# EAGLE board 2026-10-24_14-10-16 (EAGLE 6.4)
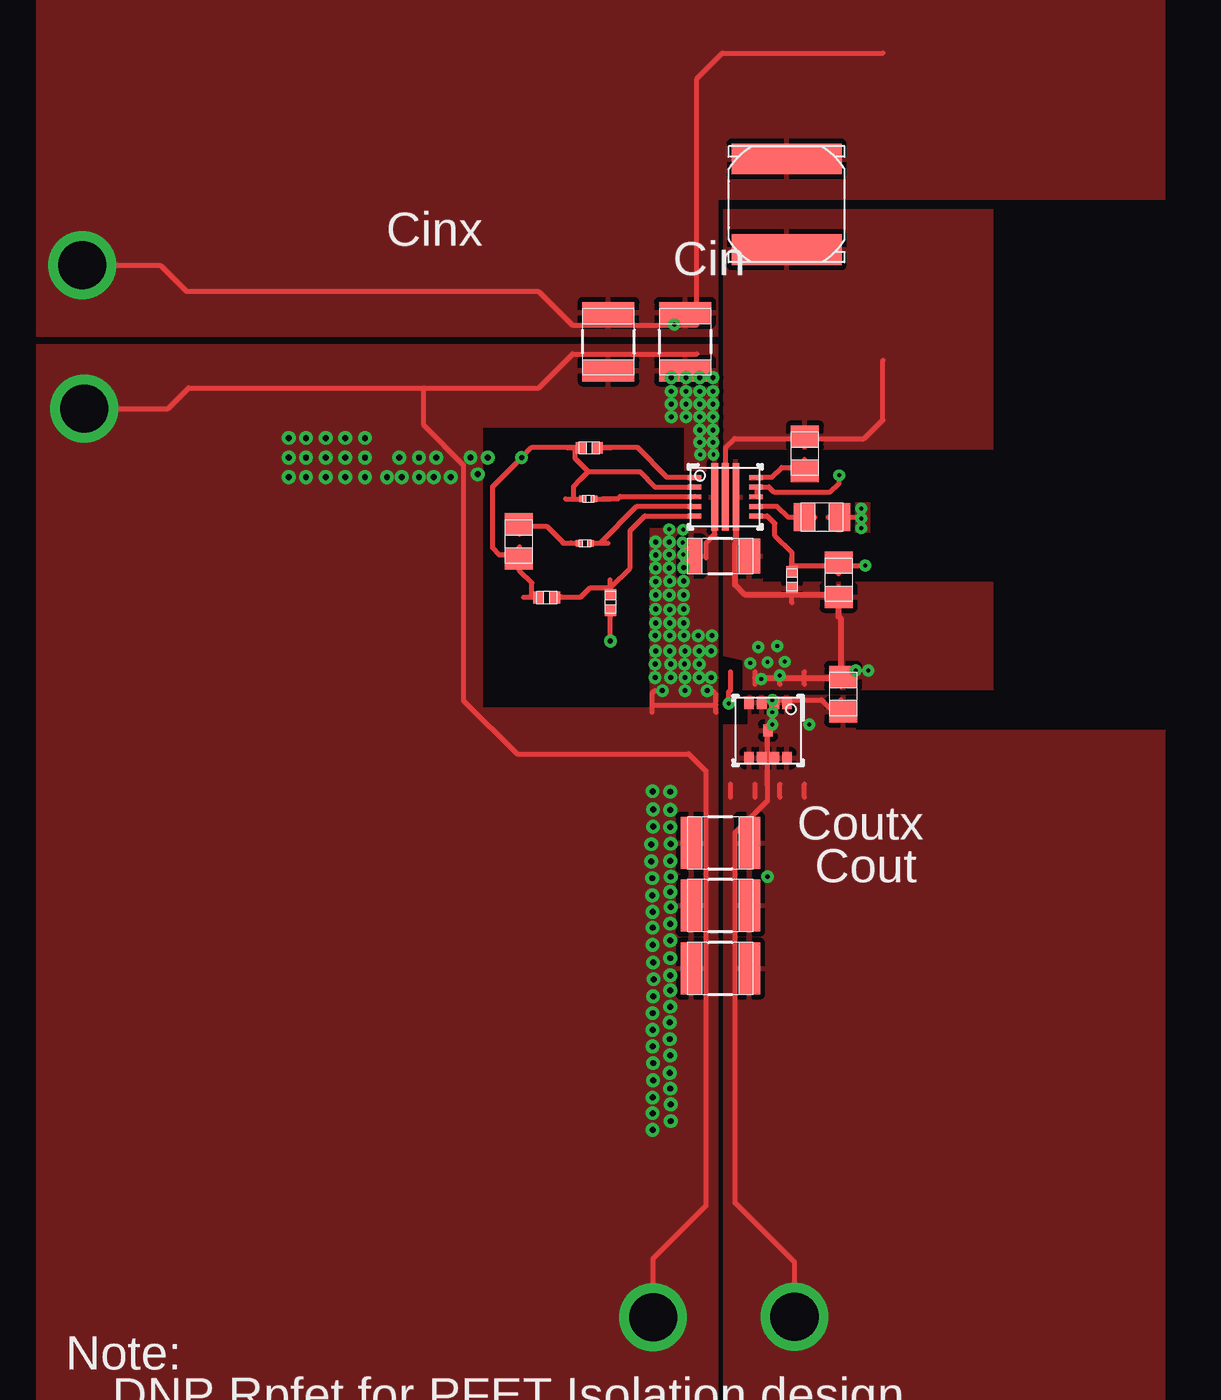
[diagram p0: board, top side]
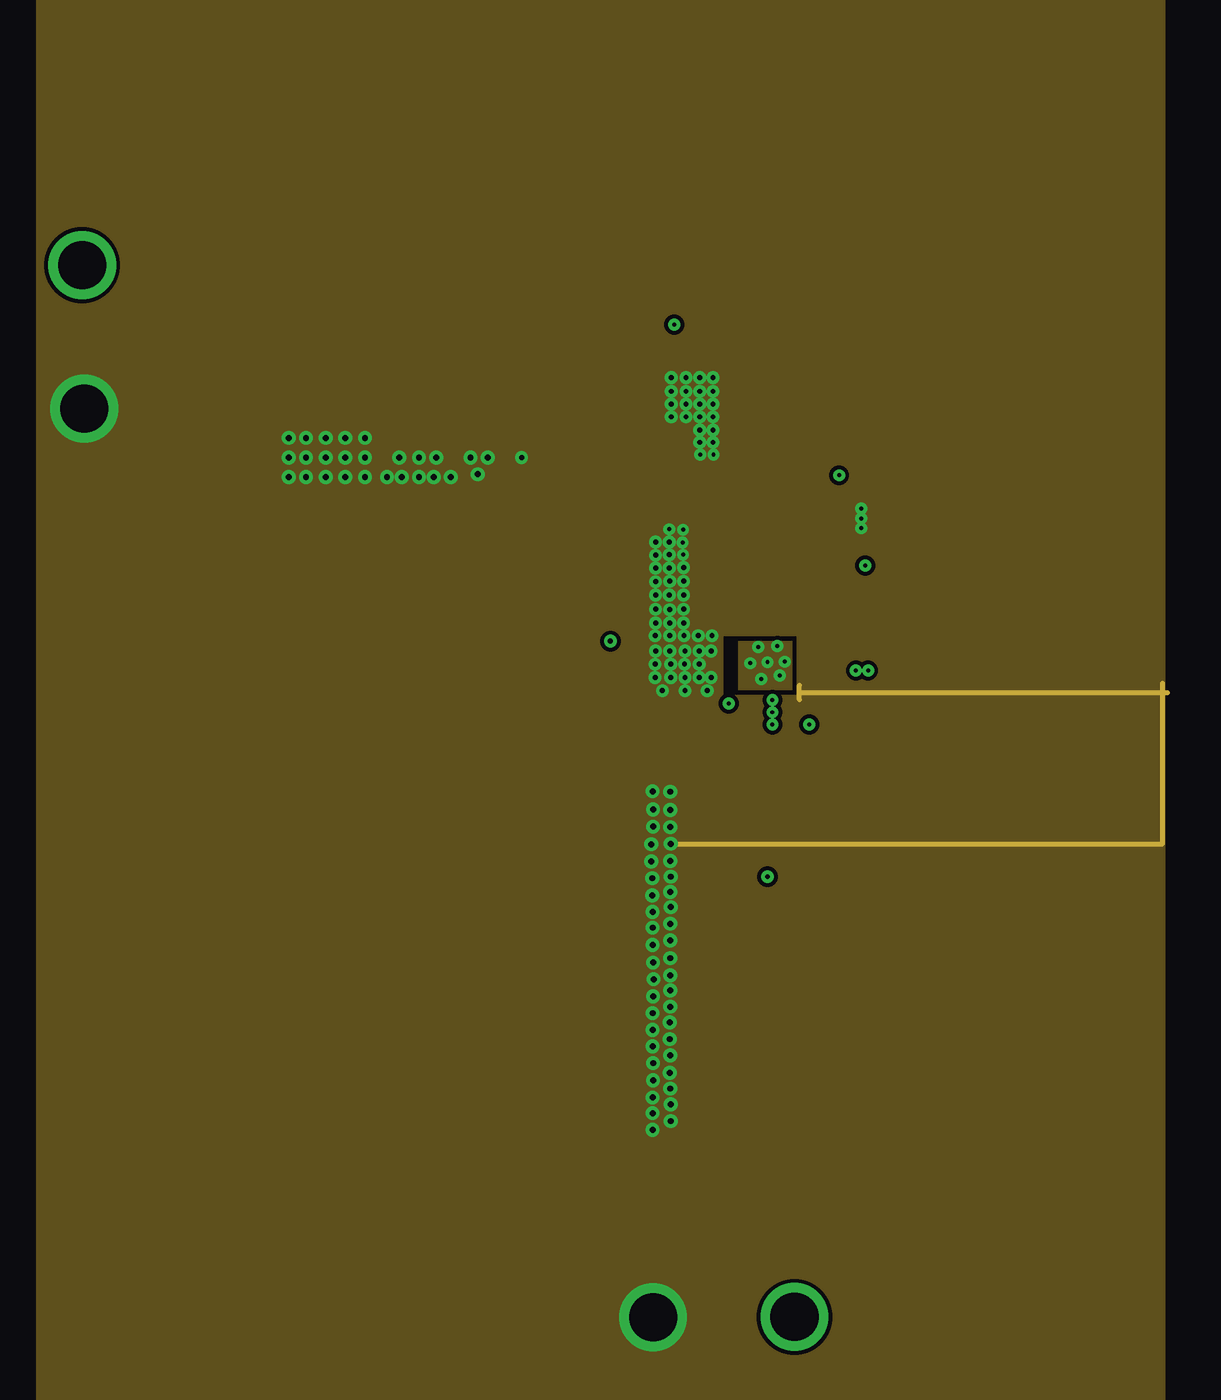
[diagram p1: board, inner layer INTERNAL1]
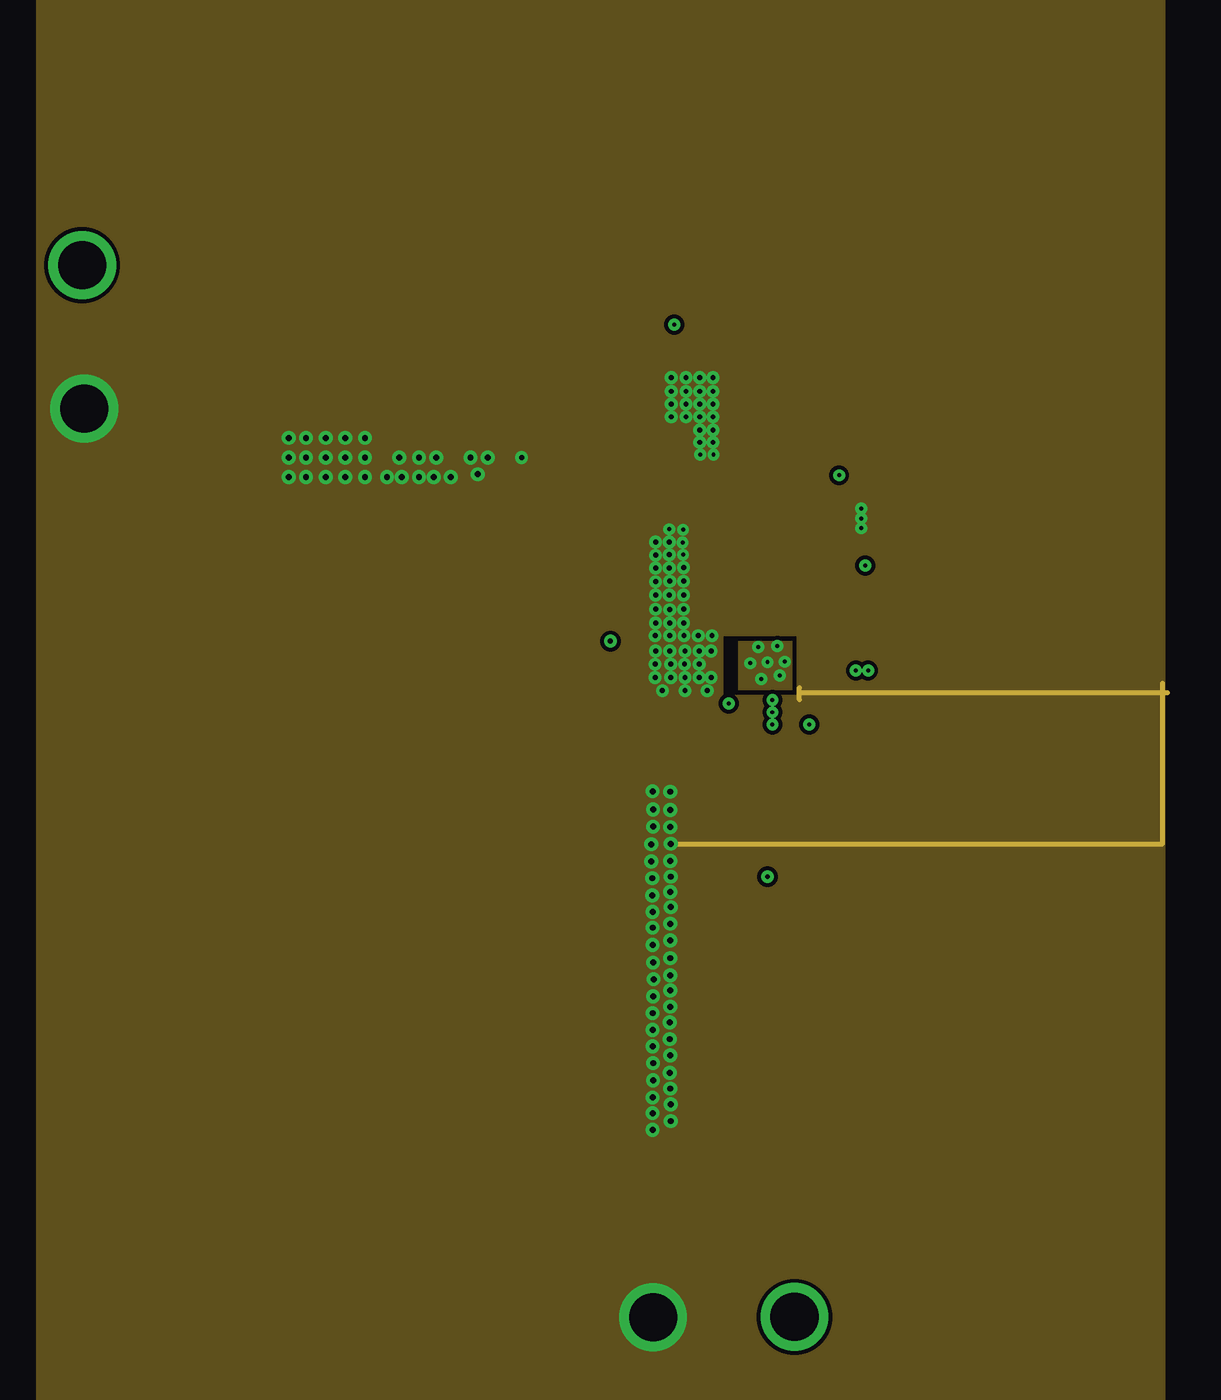
[diagram p2: board, inner layer INTERNAL2]
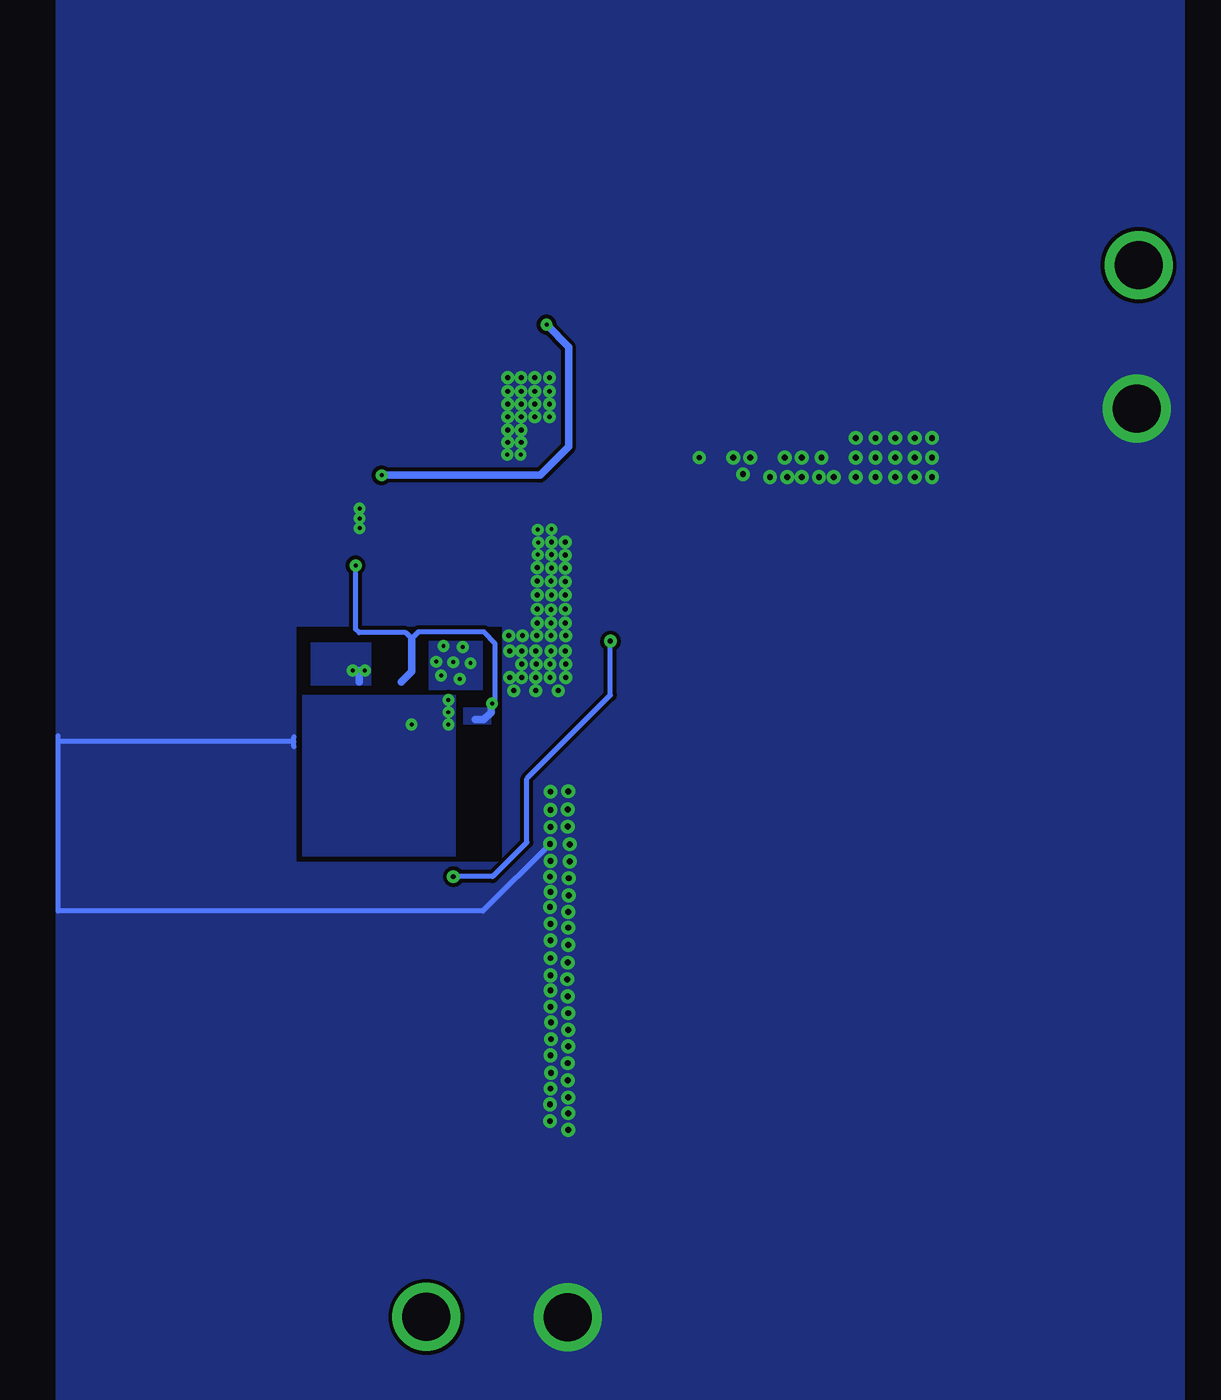
[diagram p3: board, bottom side, seen from below]

No outline drawn. Coordinates in mm, seen from the top.
Copper layers ((1*2)+(15*16)): TOP / INTERNAL1 / layer 15 / BOTTOM

## Footprints (pad centres in the part's own frame; a part is rotated, then mirrored left to right if it is on the bottom)
0805 = smd 1.118 x 1.448: 1 -0.902,0; 2 0.902,0
1210 = smd 1.118 x 2.692: 1 -1.499,0; 2 1.499,0
1206 = smd 1.118 x 1.803: 1 -1.499,0; 2 1.499,0
TP-1502 = drill 0.813 pad 1.651 round: 1 0,0
DG6045C = smd 1.6 x 5.7: 1 -2.35,0; 2 2.35,0
DQG0008A = smd 0.63 x 0.5: 1 -1.435,0.975; 2 -1.435,0.325; 3 -1.435,-0.325; 4 -1.435,-0.975; 5 1.435,-0.975; 6 1.435,-0.325; 7 1.435,0.325; 8 1.435,0.975; 9 0,0
0201 = smd 0.356 x 0.33: 1 -0.292,0; 2 0.292,0
0402 = smd 0.559 x 0.61: 1 -0.419,0; 2 0.419,0
RNW0013A = smd 0.7 x 0.25: 1 -1.6,1; 2 -1.6,0.5; 3 -1.6,0; 4 -1.6,-0.5; 5 -1.6,-1; 9 1.6,-1; 10 1.6,-0.5; 11 1.6,0; 12 1.6,0.5; 13 1.6,1 | smd 0.35 x 3.5: 6 -0.55,0; 7 0,0; 8 0.55,0

## Placement (x,y rotation side)
Cboot  [0805]  66.45,77.77 270 top
Ccomp  [0805]  51.64,73.23 270 top
Cgate  [0805]  68.2,71.25 90 top
Cin_1  [1210]  60.25,83.57 270 top
Cin_2  [1210]  56.29,83.57 270 top
Cout1  [1206]  62.08,72.47 180 top
Cout_1  [1210]  62.08,57.63 180 top
Cout_2  [1210]  62.08,54.38 180 top
Cout_3  [1210]  62.08,51.13 180 top
Cvcc  [0805]  67.34,74.5 0 top
GND  [TP-1502]  58.6,33.05 270 top
GND1  [TP-1502]  29.13,80.09 270 top
L1  [DG6045C]  65.51,90.68 90 top
M3  [DQG0008A]  64.54,63.45 270 top
Rcomp  [0201]  55.07,73.13 180 top
Rfbb  [0402]  53.09,70.33 180 top
Rfbt  [0402]  56.39,70.08 90 top
Rgate  [0402]  65.79,71.25 90 top
Rilim  [0201]  55.24,75.44 180 top
Rpfet  [0805]  68.43,65.33 270 top
Rt  [0402]  55.3,78.08 180 top
U1  [RNW0013A]  62.33,75.54 0 top
VIN  [TP-1502]  29.03,87.53 270 top
VOUT  [TP-1502]  65.89,33.1 270 top

## Library data of the parts
Cboot = ultra-librarian; RefDes: Cboot; Type: 08053C104KAT2A
Ccomp = ultra-librarian; RefDes: Ccomp; Type: CL21C182JBF1PNE
Cgate = ultra-librarian; RefDes: Cgate; Type: C0805C223K5RACTU
Cin_1 Cin_2 Cout_1-Cout_3 = ultra-librarian
Cout1 = ultra-librarian; RefDes: Cout1; Type: C3216X7R1E475K160AC
Cvcc = ultra-librarian; RefDes: Cvcc; Type: MSAST21GAB5475MTNA01
GND = ultra-librarian; RefDes: GND; Type: TP-1502
GND1 = ultra-librarian; RefDes: GND1; Type: TP-1502
L1 = ultra-librarian; RefDes: L1; Type: 1255AY-2R7N=P3
M3 = ultra-librarian; RefDes: M3; Type: CSD25404Q3
Rcomp = ultra-librarian; RefDes: Rcomp; Type: CRCW020144K2FNED
Rfbb = ultra-librarian; RefDes: Rfbb; Type: CRCW040280K6FKED
Rfbt = ultra-librarian; RefDes: Rfbt; Type: CRCW0402732KFKED
Rgate = ultra-librarian; RefDes: Rgate; Type: CRCW0402178KFKED
Rilim = ultra-librarian; RefDes: Rilim; Type: RC0201FR-07162KL
Rpfet = ultra-librarian; RefDes: Rpfet; Type: GRM32ER61E226KE15L
Rt = ultra-librarian; RefDes: Rt; Type: CRCW0402169KFKED
U1 = ultra-librarian; RefDes: U1; Type: TPS61178RNWR
VIN = ultra-librarian; RefDes: VIN; Type: TP-1502
VOUT = ultra-librarian; RefDes: VOUT; Type: TP-1502

## Nets
0: Cboot.2 U1.13
1: Cgate.2 Rgate.2 U1.9
2: Cgate.1 Cout1.1 Rgate.1 Rpfet.1 U1.8
5: Rt.1 U1.1
8: Cin_1.1 Cin_2.1 L1.2 U1.11 U1.12 VIN.1
10: Cboot.1 L1.1 U1.7
11: Rfbb.1 Rfbt.2 U1.5
13: Cout_1.1 Cout_2.1 Cout_3.1 M3.1 M3.2 M3.3 M3.4 M3.5 M3.6 M3.7 M3.8 M3.9 Rfbt.1 Rpfet.2 VOUT.1
14: Ccomp.1 Rcomp.2
18: Ccomp.2 Cin_1.2 Cin_2.2 Cout1.2 Cout_1.2 Cout_2.2 Cout_3.2 Cvcc.2 GND1.1 GND.1 Rfbb.2 Rilim.2 Rt.2 U1.2 U1.6
19: Cvcc.1 U1.10
24: Rcomp.1 U1.4
27: Rilim.1 U1.3

## Tracks (layer width: path | path; a pad name or v marks a point on that pad's centre or on a via)
0
  TOP 0.254: 63.96,76.56 64.75,76.56 65.25,77.06 66.45,77.06 | 66.43,76.63 66.43,77.47
1  (via drill 0.2 pad 0.46, 0.2 pad 0.48)
  TOP 0.254: 63.96,74.55 64.49,74.55 64.9,74.17 64.9,73.53 65.79,72.64 65.79,71.98 68.2,71.98 | 68.2,71.98 | 68.2,71.98 v69.57,71.98 | v62.51,64.85 62.51,65.43 62.61,65.53 62.61,66.17 | 65.77,71.55 65.77,72.39 | 68.19,71.55 68.19,72.39 | 62.61,65.84 62.61,66.5
  BOTTOM 0.254: v69.57,71.98 69.57,68.68 69.39,68.5 66.98,68.5 66.67,68.2 66.32,68.56 62.92,68.56 62.36,67.94 62.36,65.02 v62.51,64.85 62.59,64.77
  BOTTOM 0.381: 66.67,68.2 66.67,66.5 67.21,65.96 | 63.37,64.01 62.94,64.01 62.56,64.39 62.56,64.75
  pour BOTTOM: 64.01,64.64 64.01,63.75 62.56,63.75 62.56,64.64
2  (via drill 0.2 pad 0.48)
  TOP 0.254: 65.77,70.05 65.77,70.89 | 68.19,70.05 68.19,70.89 | 68.31,65.71 68.31,66.55 | 66.42,65.84 66.42,66.5 | 65.15,65.84 65.15,66.5 | 63.88,65.84 63.88,66.5 | 65.79,70.48
  TOP 0.305: 62.89,75.56 62.89,73.15 62.84,73.1 62.84,72.39 62.84,70.99 63.35,70.48 65.79,70.48 68.2,70.48 68.2,69.34 68.33,69.22 68.33,66.14 68.3,66.17 66.42,66.17 65.15,66.17 63.88,66.17
  BOTTOM 0.381: 69.39,66.55 v69.72,66.55 | v69.09,66.55 69.39,66.55 | 69.39,65.96 69.39,66.55
  other vias: 64.03,67.77 64.19,66.12 65.02,67.82 65.15,66.29 64.52,66.98 65.41,67.01 63.63,66.93
  pour TOP: 62.23,67.31 63.25,67.06 63.25,65.53 76.2,65.53 76.2,71.12 64.26,71.12 64.26,73.38 63.25,73.38 63.25,77.47 62.74,77.47 62.74,73.38 62.23,73.38
  pour BOTTOM: 62.99,65.53 65.79,65.53 65.79,68.07 62.99,68.07
  pour BOTTOM (rank 3): 68.76,65.79 71.88,65.79 71.88,68 68.76,68
  pour INTERNAL2 (rank 3): 62.99,68.07 65.79,68.07 65.79,65.53 62.99,65.53
  pour INTERNAL1 (rank 4): 62.99,68.07 65.79,68.07 65.79,65.53 62.99,65.53
5
  TOP 0.254: 56.06,78.11 57.78,78.11 | 57.78,78.11 | 57.78,78.11 59.31,76.56 60.76,76.56 | 55.63,78.09 56.46,78.09
8  (via drill 0.2 pad 0.46, 2.49 pad 3.48)
  TOP 0.203: 63.96,75.56 63.96,76.05
  TOP 0.254: v68.22,76.66 68.22,76.25 67.74,75.79 64.85,75.79 64.59,76.05 63.96,76.05 | v29.06,87.53 33.1,87.53 34.44,86.18 46.74,86.18 52.65,86.18 54.41,84.43 60.86,84.43 60.86,97.18 62.18,98.5 70.48,98.5
  BOTTOM 0.381: v68.22,76.66 60.02,76.66 58.55,78.13 58.55,83.29 v59.69,84.45
  pour TOP (rank 6): 26.67,110.74 85.09,110.74 85.09,90.93 61.98,90.93 61.98,83.82 26.67,83.82
10
  TOP 0.254: 62.36,75.56 62.36,78.11 62.81,78.56 66.45,78.56 69.52,78.56 70.48,79.5 70.48,82.6 | 66.43,78.13 66.43,78.97
  pour TOP: 62.23,77.98 62.23,90.42 76.2,90.42 76.2,77.98
11
  TOP 0.254: 53.82,70.36 54.86,70.36 55.35,70.84 56.39,70.84 57.4,71.86 57.4,73.79 58.17,74.55 60.76,74.55 | 56.38,70.41 56.38,71.25 | 53.39,70.34 54.23,70.34
13  (via drill 0.2 pad 0.46, 0.25 pad 0.51, 2.49 pad 3.48)
  TOP 0.254: 62.84,55.85 | 62.84,55.85 62.84,58.17 64.52,59.82 64.52,62.03 64.52,63.5 v64.77,63.75 v64.77,64.39 v64.77,65.02 67.31,65.02 67.67,64.64 68.33,64.64 | v65.91,33.1 65.91,35.92 62.84,38.99 62.84,55.85 | v56.39,68.07 56.39,69.34 | 56.38,68.91 56.38,69.75 | 68.31,64.21 68.31,65.05 | 62.61,59.99 62.61,60.66 | 63.88,59.99 63.88,60.66 | 65.15,59.99 65.15,60.66 | 66.42,59.99 66.42,60.66 | 64.5,60.6 64.5,63.48
  BOTTOM 0.254: v64.52,55.88 62.48,55.88 60.71,57.66 60.71,60.96 56.39,65.28 v56.39,68.07
  other vias: 66.67,63.75
  pour TOP (rank 5): 63.5,65.28 63.5,63.75 62.23,63.75 62.23,26.67 85.09,26.67 85.09,63.47 69.09,63.47 69.09,65.28
  pour BOTTOM (rank 2): 64.39,65.28 64.39,56.92 72.34,56.92 72.34,65.28
14
  TOP 0.254: 54.36,73.15 53.98,73.15 53.09,74.02 51.66,74.02 | 51.68,73.61 51.68,74.45 | 53.92,73.14 54.76,73.14
18  (via drill 0.2 pad 0.46, 0.25 pad 0.51, 0.3 pad 0.61, 2.49 pad 3.48)
  TOP 0.254: 46.74,81.18 34.57,81.18 33.5,80.11 v29.16,80.11 | 58.55,64.39 58.55,64.77 | 58.55,64.77 58.55,65.38 58.67,65.51 v59.08,65.51 | 61.85,64.39 61.85,64.77 | 58.55,64.77 61.85,64.77 | 61.34,58.17 61.34,61.32 60.45,62.23 51.56,62.23 48.79,64.97 48.79,77.17 46.74,79.25 46.74,81.18 | 61.34,58.17 | 61.34,58.17 61.34,55.85 61.34,38.86 58.6,36.12 v58.6,33.07 | 68.07,74.5 69.29,74.5 v69.37,74.42 | 61.34,72.39 61.34,73.15 61.8,73.61 61.8,75.56 | 55.24,76.83 57.91,76.83 58.67,76.05 60.86,76.05 | 61.85,64.77 61.85,65.3 61.65,65.51 v61.39,65.51 | 46.74,81.18 52.68,81.18 54.43,82.93 60.86,82.93 | 55.24,76.83 54.86,76.45 54.48,76.07 54.48,75.44 | 55.24,76.83 54.56,77.52 54.56,78.11 52.32,78.11 v51.79,77.57 50.29,76.07 50.29,72.9 50.62,72.54 51.66,72.54 51.66,71.73 52.32,71.09 52.32,70.36 | 51.68,72.11 51.68,72.95 | 51.89,70.34 52.73,70.34 | 54.08,75.42 54.91,75.42 | 54.13,78.09 54.97,78.09 | 67.67,74.49 68.5,74.49
  INTERNAL1 0.254: 84.96,65.41 85.22,65.41 | 66.17,65.41 84.96,65.41 | 66.17,65.05 66.17,65.41 | 66.17,65.41 66.17,65.79 | 84.96,65.41 84.96,65.89 | 84.96,65.41 84.96,57.58 v59.51,57.58 59.49,57.58
  INTERNAL2 0.254: 84.96,65.41 85.22,65.41 | 66.17,65.41 84.96,65.41 | 66.17,65.05 66.17,65.41 | 84.96,65.41 84.96,57.58 v59.51,57.58 | 84.96,65.41 84.96,65.89 | v59.51,57.58 | 66.17,65.41 66.17,65.66
  BOTTOM 0.254: 72.77,62.87 72.77,63.12 | 72.77,62.61 72.77,62.87 | 84.96,62.87 84.96,63.17 | 84.96,62.87 84.96,54.1 62.99,54.1 v59.51,57.58 | 72.77,62.87 84.96,62.87 | 59.49,57.58
  other vias: 60.3,81.71 60.3,79.68 60.25,65.51 60.17,71.17 60.25,67.56 50.04,77.57 39.75,77.57 41.66,77.57 43.69,77.57 44.83,76.56 45.59,76.56 47.24,76.56 59.44,72.54 59.44,71.86 58.72,70.46 61.59,66.19 59.44,70.46 59.49,60.27 59.49,58.45 59.49,56.69 59.51,55.88 59.51,54.31 59.49,52.58 59.49,51.66 59.49,49.99 59.46,48.34 59.46,47.47 59.49,46.63 59.46,45.72 59.51,44.09 58.57,60.3 58.6,58.47 58.5,57.56 58.5,56.67 58.55,55.8 58.57,54.05 58.57,52.35 58.62,50.57 58.6,49.68 58.57,47.96 58.6,46.23 58.6,45.34 58.57,44.45 58.57,43.64 59.46,69.01 58.72,69.72 58.72,69.01 58.7,68.35 59.46,68.35 59.51,66.19 58.7,66.88 60.99,66.19 60.99,66.88 46.48,76.56 40.64,76.56 42.67,76.56 40.64,78.59 42.67,78.59 49.53,76.71 60.93,68.35 58.72,72.52 58.72,71.86 59.44,73.86 59.54,81 59.54,80.34 61.65,68.35 61.01,78.99 61.7,78.36 61.01,78.36 61.7,78.99 61.01,81 61.7,80.34 61.7,81 61.01,80.34 69.37,74.93 69.37,73.91 40.64,77.57 42.67,77.57 45.47,77.57 47.37,77.57 46.48,77.57 49.15,77.57 59.46,71.17 58.72,71.15 59.44,73.2 58.72,73.2 59.54,79.68 59.54,81.71 61.7,79.68 61.72,77.72 61.01,79.68 61.04,77.72 61.01,81.71 61.7,81.71 39.75,76.56 41.66,76.56 43.69,76.56 39.75,78.59 41.66,78.59 43.69,78.59 48.13,76.56 59.49,44.91 59.51,43.23 58.57,47.09 58.57,42.77 59.49,55.09 59.49,53.44 59.49,50.77 59.49,49.15 58.55,54.91 58.57,53.24 58.6,51.44 58.57,48.82 59.49,59.33 58.6,59.36 60.25,66.19 59.51,66.88 58.7,66.19 58.72,67.56 59.46,69.7 60.15,73.84 60.3,80.34 60.3,81 59.46,67.56 60.99,67.56 61.59,67.56 60.22,66.88 60.17,69.01 60.2,68.35 60.17,70.46 60.17,69.72 60.17,71.88 60.12,73.18 60.15,72.54
  pour TOP (rank 6): 58.42,64.64 49.78,64.64 49.78,79.12 60.2,79.12 60.2,76.83 61.47,76.83 61.47,73.91 58.42,73.91 58.42,64.9 61.98,64.9 61.98,83.44 26.67,83.44 26.67,26.67 61.98,26.67 61.98,64.64
  pour TOP: 67.54,75.23 69.82,75.23 69.82,73.69 67.54,73.69
  pour BOTTOM (rank 2): 72.64,56.64 72.64,62.74 85.09,62.74 85.09,56.26 85.09,26.67 26.67,26.67 26.67,110.74 85.09,110.74 85.09,62.99 72.64,62.99 72.64,68.83 61.98,68.83 61.98,56.64
  pour INTERNAL2 (rank 4): 26.67,110.74 26.67,26.67 85.09,26.67 85.09,65.28 62.23,65.28 62.23,68.33 66.04,68.33 66.04,65.53 85.09,65.53 85.09,110.74
  pour INTERNAL1 (rank 5): 26.67,110.74 26.67,26.67 85.09,26.67 85.09,65.28 62.23,65.28 62.23,68.33 66.04,68.33 66.04,65.53 85.09,65.53 85.09,110.74
19
  TOP 0.254: 63.96,75.06 65,75.06 65.58,74.5 66.57,74.5 | 66.14,74.49 66.98,74.49
24
  TOP 0.254: 55.85,73.15 57.76,75.06 60.76,75.06 | 55.42,73.14 56.26,73.14
27
  TOP 0.254: 60.76,75.56 56.9,75.56 56.77,75.44 55.98,75.44 | 55.58,75.42 56.41,75.42

## Text on the board
ASSYNOTES: Cinx | Cin | Coutx | Cout | Note: | DNP Rpfet for PFET Isolation design.